# Altium PCB PCB_Flex_80.PcbDoc
Units mil, origin at the board's own origin, x right, y up, seen from the top; angles counter-clockwise.
Board outline 2362.2 x 1622.05 mil, 2 copper layers (Top Layer, Bottom Layer); 4 components, 80 nets, 320 pads, 159 vias.
Unrouted connection lines stored in the file: 1.
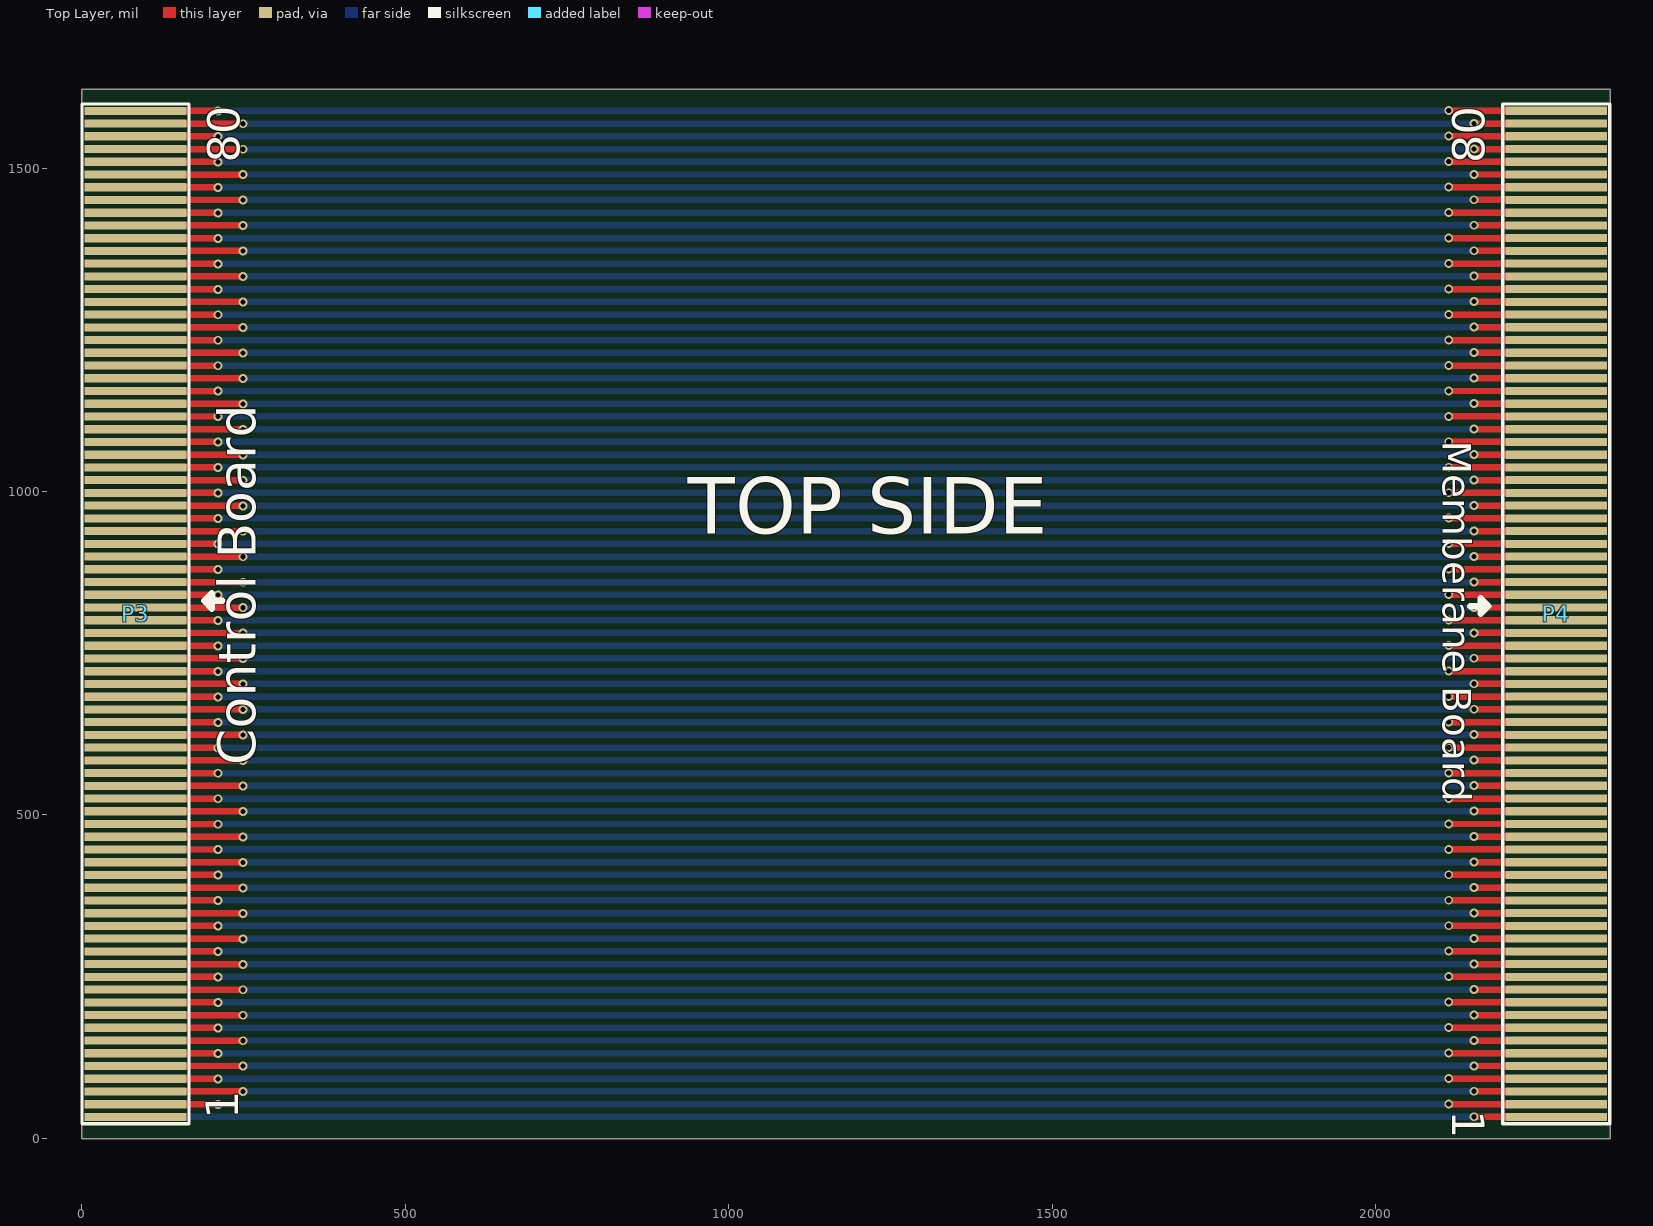
[diagram p0: Top Layer view]
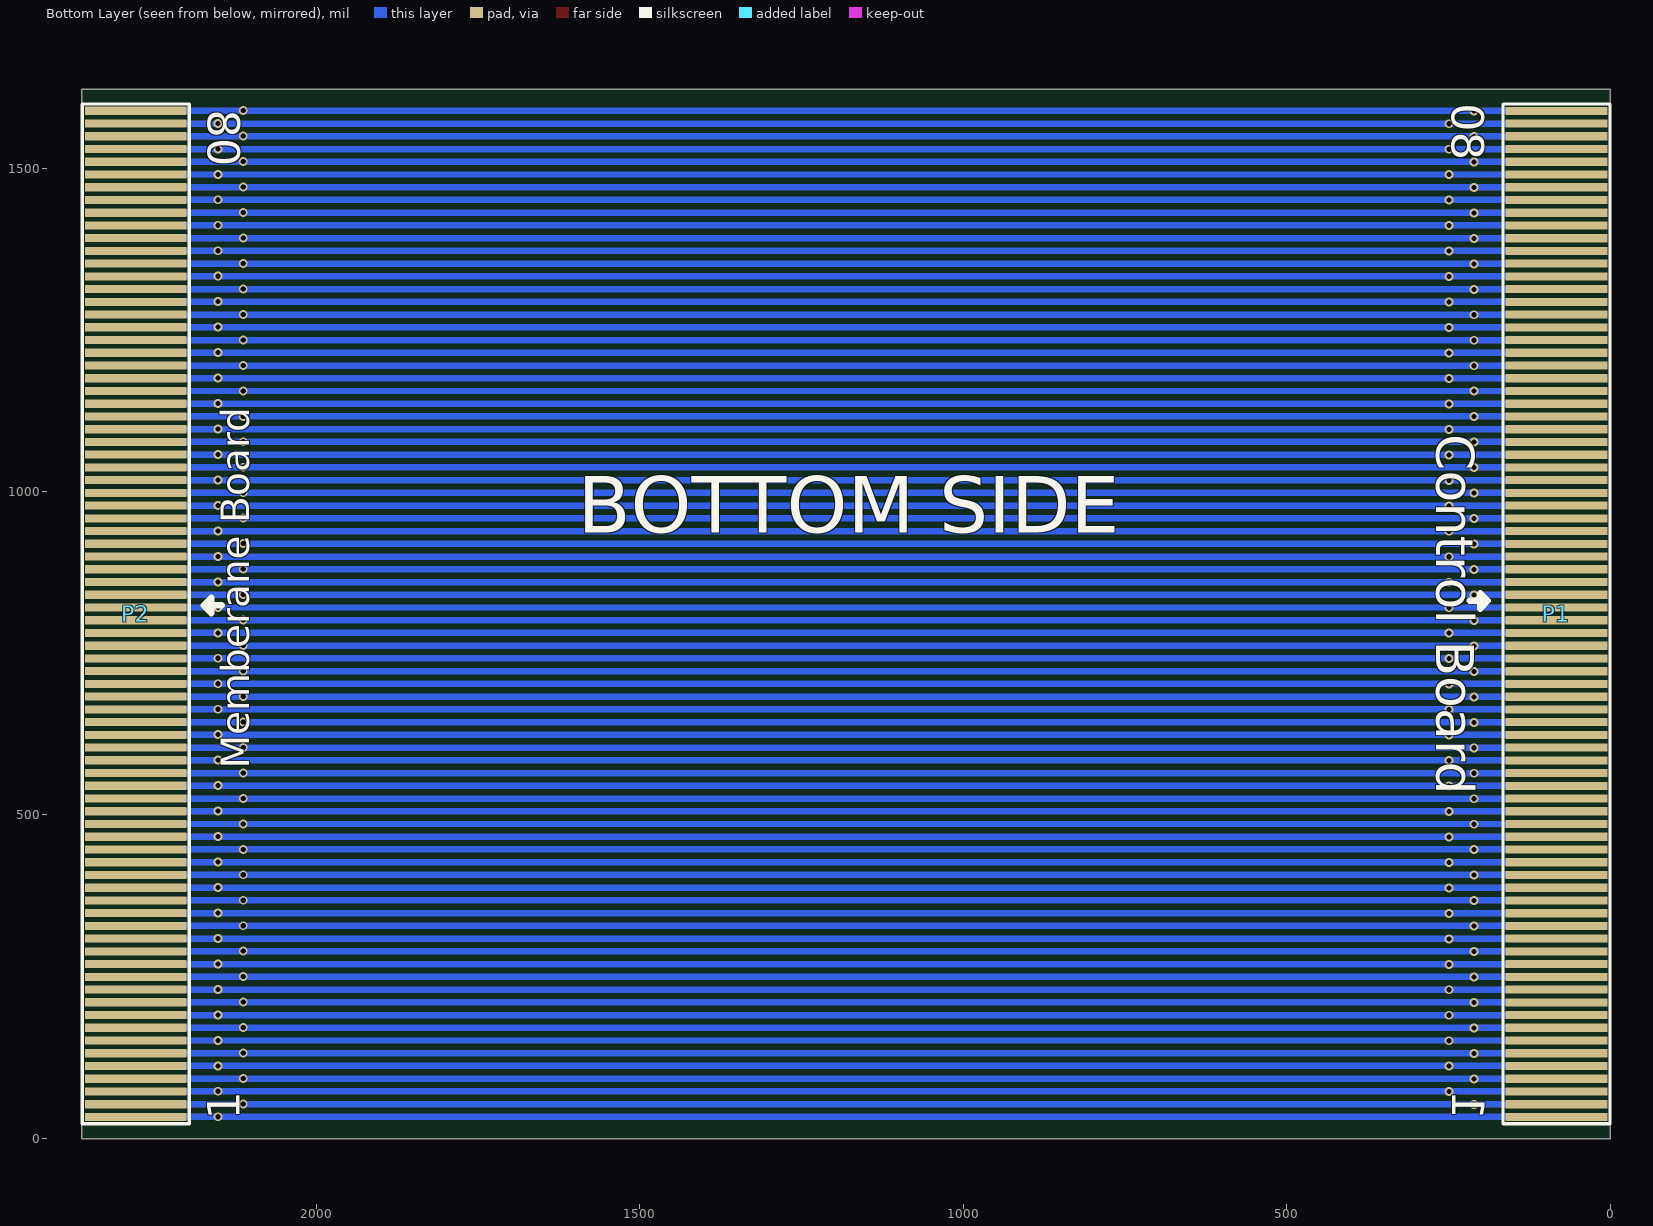
[diagram p1: Bottom Layer view, seen from below]

## Layer stack, top to bottom
Top Solder: solder mask 0.4, Solder Resist, Dk 3.5
Top Layer: signal copper 1.4
Dielectric 1: dielectric 12.6, FR-4, Dk 4.8
Bottom Layer: signal copper 1.4
Bottom Solder: solder mask 0.4, Solder Resist, Dk 3.5

## Board outline
0,-0.05 0,1622 2362.2,1622 2362.2,-0.05

## Design rules (kind name [scope] priority, off if disabled: settings)
Clearance [All] p1: gap=5 ignorepadtopadclearanceinfootprint=FALSE
ComponentClearance [All] p1: gap=0 collisioncheckmode=3 verticalgap=0 showdistances=FALSE
PolygonConnect [All] p1: connectstyle=Relief reliefconductorwidth=10 reliefentries=4 polygonreliefangle="90 Angle" airgapwidth=10
RoutingVias [All] p1: holewidth=11.81 width=23.62 viastyle="Through Hole" minholewidth=7.87 minwidth=13.78 maxholewidth=31.5 maxwidth=62.99
SolderMaskExpansion [All] p1: expansion=4 istentingtop=FALSE
Width [All] p1: maxlimit=10 minlimit=6 preferedwidth=8
29 further rules are at their usual default settings.

## Classes and differential pairs
component class Sheet1: P1 P2 P3

## Components (designator, comment, footprint, x,y, rotation, side; value= is the part's Value field where it differs from the comment)
P1 "80 Pin SMD PAD(4MM)" "80 PIN SMD PAD(4MM)" 83,810.83 r90 bottom
P2 "80 Pin SMD PAD(4MM)" "80 PIN SMD PAD(4MM)" 2279,810.88 r90 bottom locked
P3 "80 Pin SMD PAD(4MM)" "80 Pin SMD PAD(4mm)" 83,810.83 r90 top
P4 "80 Pin SMD PAD(4MM)" "80 Pin SMD PAD(4mm)" 2279,810.87 r90 top

## Footprints (in the part's own frame and the unit in brackets; to place one, negate y for a bottom-side part, rotate by r counter-clockwise, add the part's x,y. Pads: shape width x height; smd on the part's side, far side on the other; paste and mask are expansions set on the pad)
"80 PIN SMD PAD(4MM)" [mm]
  rect 0.32x4 smd: 1(-19.75,0) 2(-19.25,0) 3(-18.75,0) 4(-18.25,0) 5(-17.75,0) 6(-17.25,0) 7(-16.75,0) 8(-16.25,0) 9(-15.75,0) 10(-15.25,0) 11(-14.75,0) 12(-14.25,0) 13(-13.75,0) 14(-13.25,0) 15(-12.75,0) 16(-12.25,0) 17(-11.75,0) 18(-11.25,0) 19(-10.75,0) 20(-10.25,0) 21(-9.75,0) 22(-9.25,0) 23(-8.75,0) 24(-8.25,0) 25(-7.75,0) 26(-7.25,0) 27(-6.75,0) 28(-6.25,0) 29(-5.75,0) 30(-5.25,0) 31(-4.75,0) 32(-4.25,0) 33(-3.75,0) 34(-3.25,0) 35(-2.75,0) 36(-2.25,0) 37(-1.75,0) 38(-1.25,0) 39(-0.75,0) 40(-0.25,0) 41(0.25,0) 42(0.75,0) 43(1.25,0) 44(1.75,0) 45(2.25,0) 46(2.75,0) 47(3.25,0) 48(3.75,0) 49(4.25,0) 50(4.75,0) 51(5.25,0) 52(5.75,0) 53(6.25,0) 54(6.75,0) 55(7.25,0) 56(7.75,0) 57(8.25,0) 58(8.75,0) 59(9.25,0) 60(9.75,0) 61(10.25,0) 62(10.75,0) 63(11.25,0) 64(11.75,0) 65(12.25,0) 66(12.75,0) 67(13.25,0) 68(13.75,0) 69(14.25,0) 70(14.75,0) 71(15.25,0) 72(15.75,0) 73(16.25,0) 74(16.75,0) 75(17.25,0) 76(17.75,0) 77(18.25,0) 78(18.75,0) 79(19.25,0) 80(19.75,0)
  silkscreen extent -20.02,-2.1 20.02,2.1
"80 Pin SMD PAD(4mm)" [mm]
  rect 0.32x4 smd: 1(-19.75,0) 2(-19.25,0) 3(-18.75,0) 4(-18.25,0) 5(-17.75,0) 6(-17.25,0) 7(-16.75,0) 8(-16.25,0) 9(-15.75,0) 10(-15.25,0) 11(-14.75,0) 12(-14.25,0) 13(-13.75,0) 14(-13.25,0) 15(-12.75,0) 16(-12.25,0) 17(-11.75,0) 18(-11.25,0) 19(-10.75,0) 20(-10.25,0) 21(-9.75,0) 22(-9.25,0) 23(-8.75,0) 24(-8.25,0) 25(-7.75,0) 26(-7.25,0) 27(-6.75,0) 28(-6.25,0) 29(-5.75,0) 30(-5.25,0) 31(-4.75,0) 32(-4.25,0) 33(-3.75,0) 34(-3.25,0) 35(-2.75,0) 36(-2.25,0) 37(-1.75,0) 38(-1.25,0) 39(-0.75,0) 40(-0.25,0) 41(0.25,0) 42(0.75,0) 43(1.25,0) 44(1.75,0) 45(2.25,0) 46(2.75,0) 47(3.25,0) 48(3.75,0) 49(4.25,0) 50(4.75,0) 51(5.25,0) 52(5.75,0) 53(6.25,0) 54(6.75,0) 55(7.25,0) 56(7.75,0) 57(8.25,0) 58(8.75,0) 59(9.25,0) 60(9.75,0) 61(10.25,0) 62(10.75,0) 63(11.25,0) 64(11.75,0) 65(12.25,0) 66(12.75,0) 67(13.25,0) 68(13.75,0) 69(14.25,0) 70(14.75,0) 71(15.25,0) 72(15.75,0) 73(16.25,0) 74(16.75,0) 75(17.25,0) 76(17.75,0) 77(18.25,0) 78(18.75,0) 79(19.25,0) 80(19.75,0)
  silkscreen extent -20.02,-2.1 20.02,2.1

## Part data
P1 P2 P3 P4: "Ribbon Wire Connecting PADs, Length 2.6mm."

## Via types
v1: diameter 13.78, hole 7.87, Top Layer to Bottom Layer, tented both sides, 159 vias

## Nets (pads, with @x,y where several pads share a name; then routed paths per layer and width w, separated by ;. In a path a pad name is that pad's centre, name@x,y a point inside that pad or via, vN(x,y) a via of type N, cw(c..) or ccw(c..) an arc to the next point about the centre after c; other vN are vias at no path point)
SCL_1: P1.9 P2.9 P3.9 P4.9 | length 2490.1
  Top Layer w10: P3.9 v1@249.57,190.75 ; v1@2151.39,190.79 P4.9
  Bottom Layer w10: P1.9@83.08,190.83 P2.9
  other v1: 249.31,190.48 2151.65,191.06
SCL_2: P1.10 P2.10 P3.10 P4.10 | length 2490.1
  Top Layer w10: P3.10 v1@210.61,210.43 ; v1@2112.43,210.47 P4.10
  Bottom Layer w10: P1.10@83.08,210.52 P2.10
  other v1: 210.35,210.17 2112.69,210.74
SCL_3: P1.11 P2.11 P3.11 P4.11 | length 2490.1
  Top Layer w10: P3.11 v1@249.57,230.12 ; v1@2151.39,230.16 P4.11
  Bottom Layer w10: P1.11@83.08,230.2 P2.11
  other v1: 249.31,229.85 2151.65,230.43
SCL_4: P1.12 P2.12 P3.12 P4.12 | length 2490.1
  Top Layer w10: P3.12 v1@210.61,249.8 ; v1@2112.43,249.84 P4.12
  Bottom Layer w10: P1.12@83.08,249.89 P2.12
  other v1: 210.35,249.54 2112.69,250.11
SCL_5: P1.13 P2.13 P3.13 P4.13 | length 2490.1
  Top Layer w10: P3.13 v1@249.57,269.49 ; v1@2151.39,269.53 P4.13
  Bottom Layer w10: P1.13@83.08,269.57 P2.13@2279.03,269.57
  other v1: 249.31,269.22 2151.65,269.8
SCL_6: P1.14 P2.14 P3.14 P4.14 | length 2490.1
  Top Layer w10: P3.14 v1@210.61,289.17 ; v1@2112.43,289.21 P4.14
  Bottom Layer w10: P1.14@83.08,289.26 P2.14@2279.03,289.26
  other v1: 210.35,288.91 2112.69,289.48
SCL_7: P1.15 P2.15 P3.15 P4.15 | length 2490.1
  Top Layer w10: P3.15 v1@249.57,308.86 ; v1@2151.39,308.9 P4.15
  Bottom Layer w10: P1.15@83.08,308.94 P2.15
  other v1: 249.31,308.59 2151.65,309.17
SCL_8: P1.16 P2.16 P3.16 P4.16 | length 2490.1
  Top Layer w10: P3.16 v1@210.61,328.54 ; v1@2112.43,328.58 P4.16
  Bottom Layer w10: P1.16@83.08,328.63 P2.16
  other v1: 210.35,328.28 2112.69,328.85
SCL_9: P1.25 P2.25 P3.25 P4.25 | length 2490.1
  Top Layer w10: P3.25 v1@249.57,505.71 ; v1@2151.39,505.75 P4.25
  Bottom Layer w10: P1.25@83.06,505.76 P2.25
  other v1: 249.31,505.44 2151.65,506.02
SCL_10: P1.26 P2.26 P3.26 P4.26 | length 2490.1
  Top Layer w10: P3.26 v1@210.61,525.39 ; v1@2112.43,525.43 P4.26
  Bottom Layer w10: P1.26@83.06,525.45 P2.26
  other v1: 210.35,525.13 2112.69,525.7
SCL_11: P1.27 P2.27 P3.27 P4.27 | length 2490.1
  Top Layer w10: P3.27 v1@249.57,545.08 ; v1@2151.39,545.12 P4.27
  Bottom Layer w10: P1.27@83.08,545.16 P2.27@2279.03,545.16
  other v1: 249.31,544.81 2151.65,545.39
SCL_12: P1.28 P2.28 P3.28 P4.28 | length 2490.1
  Top Layer w10: P3.28 v1@210.61,564.76 ; v1@2112.43,564.8 P4.28
  Bottom Layer w10: P1.28@83.08,564.85 P2.28
  other v1: 210.35,564.5 2112.69,565.07
SCL_13: P1.29 P2.29 P3.29 P4.29 | length 2490.1
  Top Layer w10: P3.29 v1@249.57,584.45 ; v1@2151.39,584.49 P4.29
  Bottom Layer w10: P1.29@83.08,584.53 P2.29
  other v1: 249.31,584.18 2151.65,584.76
SCL_14: P1.30 P2.30 P3.30 P4.30 | length 2490.1
  Top Layer w10: P3.30 v1@210.61,604.13 ; v1@2112.43,604.17 P4.30
  Bottom Layer w10: P1.30@83.08,604.22 P2.30
  other v1: 210.35,603.87 2112.69,604.44
SCL_15: P1.31 P2.31 P3.31 P4.31 | length 2490.1
  Top Layer w10: P3.31 v1@249.57,623.82 ; v1@2151.39,623.86 P4.31
  Bottom Layer w10: P1.31@83.08,623.9 P2.31
  other v1: 249.31,623.55 2151.65,624.13
SCL_16: P1.32 P2.32 P3.32 P4.32 | length 2490.1
  Top Layer w10: P3.32 v1@210.61,643.5 ; v1@2112.43,643.54 P4.32
  Bottom Layer w10: P1.32@83.08,643.59 P2.32
  other v1: 210.35,643.24 2112.69,643.81
SCL_17: P1.41 P2.41 P3.41 P4.41 | length 2490.1
  Top Layer w10: P3.41 v1@249.57,820.67 ; v1@2151.39,820.71 P4.41
  Bottom Layer w10: P1.41@83.06,820.72 P2.41
  other v1: 249.31,820.4 2151.65,820.98
SCL_18: P1.42 P2.42 P3.42 P4.42 | length 2490.1
  Top Layer w10: P3.42 v1@210.61,840.35 ; v1@2112.43,840.39 P4.42
  Bottom Layer w10: P1.42@83.06,840.41 P2.42
  other v1: 210.35,840.09 2112.69,840.66
SCL_19: P1.43 P2.43 P3.43 P4.43 | length 2490.1
  Top Layer w10: P3.43 v1@249.57,860.04 ; v1@2151.39,860.08 P4.43
  Bottom Layer w10: P1.43@83.06,860.09 P2.43
  other v1: 249.31,859.77 2151.65,860.35
SCL_20: P1.44 P2.44 P3.44 P4.44 | length 2490.1
  Top Layer w10: P3.44 v1@210.61,879.72 ; v1@2112.43,879.76 P4.44
  Bottom Layer w10: P1.44@83.06,879.78 P2.44
  other v1: 210.35,879.46 2112.69,880.03
SCL_21: P1.45 P2.45 P3.45 P4.45 | length 2490.1
  Top Layer w10: P3.45 v1@249.57,899.41 ; v1@2151.39,899.45 P4.45
  Bottom Layer w10: P1.45@83.08,899.49 P2.45
  other v1: 249.31,899.14 2151.65,899.72
SCL_22: P1.46 P2.46 P3.46 P4.46 | length 2490.1
  Top Layer w10: P3.46 v1@210.61,919.09 ; v1@2112.43,919.13 P4.46
  Bottom Layer w10: P1.46@83.08,919.18 P2.46@2279.03,919.18
  other v1: 210.35,918.83 2112.69,919.4
SCL_23: P1.47 P2.47 P3.47 P4.47 | length 2490.1
  Top Layer w10: P3.47 v1@249.57,938.78 ; v1@2151.39,938.82 P4.47
  Bottom Layer w10: P1.47@83.08,938.86 P2.47@2279.03,938.86
  other v1: 249.31,938.51 2151.65,939.09
SCL_24: P1.48 P2.48 P3.48 P4.48 | length 2490.1
  Top Layer w10: P3.48 v1@210.61,958.46 ; v1@2112.43,958.5 P4.48
  Bottom Layer w10: P1.48@83.08,958.55 P2.48
  other v1: 210.35,958.2 2112.69,958.77
SCL_25: P1.57 P2.57 P3.57 P4.57 | length 2490.1
  Top Layer w10: P3.57 v1@249.57,1135.63 ; v1@2151.39,1135.67 P4.57
  Bottom Layer w10: P1.57@83.06,1135.68 P2.57
  other v1: 249.31,1135.36 2151.65,1135.94
SCL_26: P1.58 P2.58 P3.58 P4.58 | length 2490.1
  Top Layer w10: P3.58 v1@210.61,1155.32 ; v1@2112.43,1155.35 P4.58
  Bottom Layer w10: P1.58@83.06,1155.37 P2.58
  other v1: 210.35,1155.05 2112.69,1155.62
SCL_27: P1.59 P2.59 P3.59 P4.59 | length 2490.1
  Top Layer w10: P3.59 v1@249.57,1175 ; v1@2151.39,1175.04 P4.59
  Bottom Layer w10: P1.59@83.06,1175.05 P2.59
  other v1: 249.31,1174.73 2151.65,1175.31
SCL_28: P1.60 P2.60 P3.60 P4.60 | length 2490.1
  Top Layer w10: P3.60 v1@210.61,1194.69 ; v1@2112.43,1194.72 P4.60
  Bottom Layer w10: P1.60@83.06,1194.74 P2.60
  other v1: 210.35,1194.42 2112.69,1194.99
SCL_29: P1.61 P2.61 P3.61 P4.61 | length 2490.1
  Top Layer w10: P3.61 v1@249.57,1214.37 ; v1@2151.39,1214.41 P4.61
  Bottom Layer w10: P1.61@83.06,1214.43 P2.61
  other v1: 249.31,1214.1 2151.65,1214.68
SCL_30: P1.62 P2.62 P3.62 P4.62 | length 2490.1
  Top Layer w10: P3.62 v1@210.61,1234.06 ; v1@2112.43,1234.09 P4.62
  Bottom Layer w10: P1.62@83.06,1234.11 P2.62
  other v1: 210.35,1233.79 2112.69,1234.36
SCL_31: P1.63 P2.63 P3.63 P4.63 | length 2490.1
  Top Layer w10: P3.63 v1@249.57,1253.74 ; v1@2151.39,1253.78 P4.63
  Bottom Layer w10: P1.63@83.06,1253.8 P2.63
  other v1: 249.31,1253.47 2151.65,1254.05
SCL_32: P1.64 P2.64 P3.64 P4.64 | length 2490.1
  Top Layer w10: P3.64 v1@210.61,1273.43 ; v1@2112.43,1273.46 P4.64
  Bottom Layer w10: P1.64@83.06,1273.48 P2.64
  other v1: 210.35,1273.16 2112.69,1273.73
SCL_33: P1.73 P2.73 P3.73 P4.73 | length 2490.1
  Top Layer w10: P3.73 v1@249.57,1450.59 ; v1@2151.39,1450.63 P4.73
  Bottom Layer w10: P1.73 P2.73
  other v1: 249.31,1450.32 2151.65,1450.9
SCL_34: P1.74 P2.74 P3.74 P4.74 | length 2490.1
  Top Layer w10: P3.74 v1@210.61,1470.28 ; v1@2112.43,1470.32 P4.74
  Bottom Layer w10: P1.74 P2.74
  other v1: 210.35,1470.01 2112.69,1470.58
SCL_35: P1.75 P2.75 P3.75 P4.75 | length 2490.1
  Top Layer w10: P3.75 v1@249.57,1489.96 ; v1@2151.39,1490 P4.75
  Bottom Layer w10: P1.75 P2.75
  other v1: 249.31,1489.69 2151.65,1490.27
SCL_36: P1.76 P2.76 P3.76 P4.76 | length 2490.1
  Top Layer w10: P3.76 v1@210.61,1509.65 ; v1@2112.43,1509.69 P4.76
  Bottom Layer w10: P1.76@83.03,1509.67 P2.76
  other v1: 210.35,1509.38 2112.69,1509.95
SCL_37: P1.77 P2.77 P3.77 P4.77 | length 2490.1
  Top Layer w10: P3.77 v1@249.57,1529.33 ; v1@2151.39,1529.37 P4.77
  Bottom Layer w10: P1.77@83.03,1529.36 P2.77
  other v1: 249.31,1529.06 2151.65,1529.64
SCL_38: P1.78 P2.78 P3.78 P4.78 | length 2490.1
  Top Layer w10: P3.78 v1@210.61,1549.02 ; v1@2112.43,1549.06 P4.78
  Bottom Layer w10: P1.78 P2.78@2278.97,1549.04
  other v1: 210.35,1548.75 2112.69,1549.32
SCL_39: P1.79 P2.79 P3.79 P4.79 | length 2490.1
  Top Layer w10: P3.79 v1@249.57,1568.7 ; v1@2151.39,1568.74 P4.79
  Bottom Layer w10: P1.79 P2.79@2278.97,1568.73
  other v1: 249.31,1568.43 2151.65,1569.01
SCL_40: P1.80 P2.80 P3.80 P4.80 | length 2490.1
  Top Layer w10: P3.80 v1@210.61,1588.39 ; v1@2112.43,1588.43 P4.80
  Bottom Layer w10: P1.80 P2.80
  other v1: 210.35,1588.12 2112.69,1588.69
SDA_1: P1.1 P2.1 P3.1 P4.1 | length 2323.6
  Top Layer w10: v1@2151.39,33.31 P4.1
  Bottom Layer w10: P1.1@83.06,33.32 P2.1
  other v1: 2151.65,33.57
SDA_2: P1.2 P2.2 P3.2 P4.2 | length 2490.1
  Top Layer w10: P3.2 v1@210.61,52.95 ; v1@2112.43,52.99 P4.2
  Bottom Layer w10: P1.2@83.06,53.01 P2.2
  other v1: 210.35,52.69 2112.69,53.26
SDA_3: P1.3 P2.3 P3.3 P4.3 | length 2490.1
  Top Layer w10: P3.3 v1@249.57,72.64 ; v1@2151.39,72.68 P4.3
  Bottom Layer w10: P1.3@83.06,72.69 P2.3
  other v1: 249.31,72.37 2151.65,72.94
SDA_4: P1.4 P2.4 P3.4 P4.4 | length 2490.1
  Top Layer w10: P3.4 v1@210.61,92.32 ; v1@2112.43,92.36 P4.4
  Bottom Layer w10: P1.4@83.06,92.38 P2.4
  other v1: 210.35,92.06 2112.69,92.63
SDA_5: P1.5 P2.5 P3.5 P4.5 | length 2490.1
  Top Layer w10: P3.5 v1@249.57,112.01 ; v1@2151.39,112.05 P4.5
  Bottom Layer w10: P1.5@83.06,112.06 P2.5
  other v1: 249.31,111.74 2151.65,112.32
SDA_6: P1.6 P2.6 P3.6 P4.6 | length 2490.1
  Top Layer w10: P3.6 v1@210.61,131.69 ; v1@2112.43,131.73 P4.6
  Bottom Layer w10: P1.6@83.06,131.75 P2.6
  other v1: 210.35,131.43 2112.69,132
SDA_7: P1.7 P2.7 P3.7 P4.7 | length 2490.1
  Top Layer w10: P3.7 v1@249.57,151.38 ; v1@2151.39,151.42 P4.7
  Bottom Layer w10: P1.7@83.06,151.43 P2.7
  other v1: 249.31,151.11 2151.65,151.68
SDA_8: P1.8 P2.8 P3.8 P4.8 | length 2490.1
  Top Layer w10: P3.8 v1@210.61,171.06 ; v1@2112.43,171.1 P4.8
  Bottom Layer w10: P1.8@83.06,171.12 P2.8
  other v1: 210.35,170.8 2112.69,171.37
SDA_9: P1.17 P2.17 P3.17 P4.17 | length 2490.1
  Top Layer w10: P3.17 v1@249.57,348.23 ; v1@2151.39,348.27 P4.17
  Bottom Layer w10: P1.17@83.08,348.31 P2.17
  other v1: 249.31,347.96 2151.65,348.54
SDA_10: P1.18 P2.18 P3.18 P4.18 | length 2490.1
  Top Layer w10: P3.18 v1@210.61,367.91 ; v1@2112.43,367.95 P4.18
  Bottom Layer w10: P1.18@83.06,367.97 P2.18
  other v1: 210.35,367.65 2112.69,368.22
SDA_11: P1.19 P2.19 P3.19 P4.19 | length 2490.1
  Top Layer w10: P3.19 v1@249.57,387.6 ; v1@2151.39,387.64 P4.19
  Bottom Layer w10: P1.19@83.06,387.65 P2.19
  other v1: 249.31,387.33 2151.65,387.91
SDA_12: P1.20 P2.20 P3.20 P4.20 | length 2490.1
  Top Layer w10: P3.20 v1@210.61,407.28 ; v1@2112.43,407.32 P4.20
  Bottom Layer w10: P1.20@83.06,407.34 P2.20
  other v1: 210.35,407.02 2112.69,407.59
SDA_13: P1.21 P2.21 P3.21 P4.21 | length 2490.1
  Top Layer w10: P3.21 v1@249.57,426.97 ; v1@2151.39,427.01 P4.21
  Bottom Layer w10: P1.21@83.06,427.02 P2.21
  other v1: 249.31,426.7 2151.65,427.28
SDA_14: P1.22 P2.22 P3.22 P4.22 | length 2490.1
  Top Layer w10: P3.22 v1@210.61,446.65 ; v1@2112.43,446.69 P4.22
  Bottom Layer w10: P1.22@83.06,446.71 P2.22
  other v1: 210.35,446.39 2112.69,446.96
SDA_15: P1.23 P2.23 P3.23 P4.23 | length 2490.1
  Top Layer w10: P3.23 v1@249.57,466.34 ; v1@2151.39,466.38 P4.23
  Bottom Layer w10: P1.23@83.06,466.39 P2.23
  other v1: 249.31,466.07 2151.65,466.65
SDA_16: P1.24 P2.24 P3.24 P4.24 | length 2490.1
  Top Layer w10: P3.24 v1@210.61,486.02 ; v1@2112.43,486.06 P4.24
  Bottom Layer w10: P1.24@83.06,486.08 P2.24
  other v1: 210.35,485.76 2112.69,486.33
SDA_17: P1.33 P2.33 P3.33 P4.33 | length 2490.1
  Top Layer w10: P3.33 v1@249.57,663.19 ; v1@2151.39,663.23 P4.33
  Bottom Layer w10: P1.33@83.08,663.27 P2.33@2279.03,663.27
  other v1: 249.31,662.92 2151.65,663.5
SDA_18: P1.34 P2.34 P3.34 P4.34 | length 2490.1
  Top Layer w10: P3.34 v1@210.61,682.87 ; v1@2112.43,682.91 P4.34
  Bottom Layer w10: P1.34@83.08,682.96 P2.34@2279.03,682.96
  other v1: 210.35,682.61 2112.69,683.18
SDA_19: P1.35 P2.35 P3.35 P4.35 | length 2490.1
  Top Layer w10: P3.35 v1@249.57,702.56 ; v1@2151.39,702.6 P4.35
  Bottom Layer w10: P1.35@83.08,702.64 P2.35
  other v1: 249.31,702.29 2151.65,702.87
SDA_20: P1.36 P2.36 P3.36 P4.36 | length 2490.1
  Top Layer w10: P3.36 v1@210.61,722.24 ; v1@2112.43,722.28 P4.36
  Bottom Layer w10: P1.36@83.06,722.3 P2.36
  other v1: 210.35,721.98 2112.69,722.55
SDA_21: P1.37 P2.37 P3.37 P4.37 | length 2490.1
  Top Layer w10: P3.37 v1@249.57,741.93 ; v1@2151.39,741.97 P4.37
  Bottom Layer w10: P1.37@83.06,741.98 P2.37
  other v1: 249.31,741.66 2151.65,742.24
SDA_22: P1.38 P2.38 P3.38 P4.38 | length 2490.1
  Top Layer w10: P3.38 v1@210.61,761.61 ; v1@2112.43,761.65 P4.38
  Bottom Layer w10: P1.38@83.06,761.67 P2.38
  other v1: 210.35,761.35 2112.69,761.92
SDA_23: P1.39 P2.39 P3.39 P4.39 | length 2490.1
  Top Layer w10: P3.39 v1@249.57,781.3 ; v1@2151.39,781.34 P4.39
  Bottom Layer w10: P1.39@83.06,781.35 P2.39
  other v1: 249.31,781.03 2151.65,781.61
SDA_24: P1.40 P2.40 P3.40 P4.40 | length 2490.1
  Top Layer w10: P3.40 v1@210.61,800.98 ; v1@2112.43,801.02 P4.40
  Bottom Layer w10: P1.40@83.06,801.04 P2.40
  other v1: 210.35,800.72 2112.69,801.29
SDA_25: P1.49 P2.49 P3.49 P4.49 | length 2490.1
  Top Layer w10: P3.49 v1@249.57,978.15 ; v1@2151.39,978.19 P4.49
  Bottom Layer w10: P1.49@83.08,978.23 P2.49
  other v1: 249.31,977.88 2151.65,978.46
SDA_26: P1.50 P2.50 P3.50 P4.50 | length 2490.1
  Top Layer w10: P3.50 v1@210.61,997.83 ; v1@2112.43,997.87 P4.50
  Bottom Layer w10: P1.50@83.08,997.92 P2.50
  other v1: 210.35,997.57 2112.69,998.14
SDA_27: P1.51 P2.51 P3.51 P4.51 | length 2490.1
  Top Layer w10: P3.51 v1@249.57,1017.52 ; v1@2151.39,1017.56 P4.51
  Bottom Layer w10: P1.51@83.08,1017.6 P2.51
  other v1: 249.31,1017.25 2151.65,1017.83
SDA_28: P1.52 P2.52 P3.52 P4.52 | length 2490.1
  Top Layer w10: P3.52 v1@210.61,1037.2 ; v1@2112.43,1037.24 P4.52
  Bottom Layer w10: P1.52@83.08,1037.29 P2.52
  other v1: 210.35,1036.94 2112.69,1037.51
SDA_29: P1.53 P2.53 P3.53 P4.53 | length 2490.1
  Top Layer w10: P3.53 v1@249.57,1056.89 ; v1@2151.39,1056.93 P4.53
  Bottom Layer w10: P1.53@83.08,1056.97 P2.53@2279.03,1056.97
  other v1: 249.31,1056.62 2151.65,1057.2
SDA_30: P1.54 P2.54 P3.54 P4.54 | length 2490.1
  Top Layer w10: P3.54 v1@210.61,1076.57 ; v1@2112.43,1076.61 P4.54
  Bottom Layer w10: P1.54@83.06,1076.63 P2.54
  other v1: 210.35,1076.31 2112.69,1076.88
SDA_31: P1.55 P2.55 P3.55 P4.55 | length 2490.1
  Top Layer w10: P3.55 v1@249.57,1096.26 ; v1@2151.39,1096.3 P4.55
  Bottom Layer w10: P1.55@83.06,1096.32 P2.55
  other v1: 249.31,1095.99 2151.65,1096.57
SDA_32: P1.56 P2.56 P3.56 P4.56 | length 2490.1
  Top Layer w10: P3.56 v1@210.61,1115.95 ; v1@2112.43,1115.98 P4.56
  Bottom Layer w10: P1.56@83.06,1116 P2.56
  other v1: 210.35,1115.68 2112.69,1116.25
SDA_33: P1.65 P2.65 P3.65 P4.65 | length 2490.1
  Top Layer w10: P3.65 v1@249.57,1293.11 ; v1@2151.39,1293.15 P4.65
  Bottom Layer w10: P1.65@83.06,1293.17 P2.65
  other v1: 249.31,1292.84 2151.65,1293.42
SDA_34: P1.66 P2.66 P3.66 P4.66 | length 2490.1
  Top Layer w10: P3.66 v1@210.61,1312.8 ; v1@2112.43,1312.83 P4.66
  Bottom Layer w10: P1.66@83.06,1312.85 P2.66
  other v1: 210.35,1312.53 2112.69,1313.1
SDA_35: P1.67 P2.67 P3.67 P4.67 | length 2490.1
  Top Layer w10: P3.67 v1@249.57,1332.48 ; v1@2151.39,1332.52 P4.67
  Bottom Layer w10: P1.67@83.06,1332.54 P2.67
  other v1: 249.31,1332.21 2151.65,1332.79
SDA_36: P1.68 P2.68 P3.68 P4.68 | length 2490.1
  Top Layer w10: P3.68 v1@210.61,1352.17 ; v1@2112.43,1352.2 P4.68
  Bottom Layer w10: P1.68@83.06,1352.22 P2.68
  other v1: 210.35,1351.9 2112.69,1352.47
SDA_37: P1.69 P2.69 P3.69 P4.69 | length 2490.1
  Top Layer w10: P3.69 v1@249.57,1371.85 ; v1@2151.39,1371.89 P4.69
  Bottom Layer w10: P1.69@83.06,1371.91 P2.69
  other v1: 249.31,1371.58 2151.65,1372.16
SDA_38: P1.70 P2.70 P3.70 P4.70 | length 2490.1
  Top Layer w10: P3.70 v1@210.61,1391.54 ; v1@2112.43,1391.57 P4.70
  Bottom Layer w10: P1.70@83.06,1391.59 P2.70
  other v1: 210.35,1391.27 2112.69,1391.84
SDA_39: P1.71 P2.71 P3.71 P4.71 | length 2490.1
  Top Layer w10: P3.71 v1@249.57,1411.22 ; v1@2151.39,1411.26 P4.71
  Bottom Layer w10: P1.71@83.06,1411.28 P2.71
  other v1: 249.31,1410.95 2151.65,1411.53
SDA_40: P1.72 P2.72 P3.72 P4.72 | length 2490.1
  Top Layer w10: P3.72 v1@210.61,1430.91 ; v1@2112.43,1430.94 P4.72
  Bottom Layer w10: P1.72 P2.72@2278.97,1430.93
  other v1: 210.35,1430.64 2112.69,1431.21

## Silkscreen, mask and mechanical layers (free items; w line width, h text height)
Top Overlay:
  lines w10: 201,830.95 217,830.95 ; 2146.01,822.96 2162.01,822.96 ; 189,830.95 201,818.95 201,842.95 189,830.95 ; 2162.01,810.96 2174.01,822.96 2162.01,834.96 2162.01,810.96
  text "80" at 244.04,1507.89 h50 r90
  text "80" at 2168.75,1507.21 h50 r90
  text "Memberane Board" at 2088.66,1078.71 h75 r270
  text "TOP SIDE" at 936.64,906.32 h150
  text "Control Board" at 288.12,576.54 h100 r90
  text "1" at 2118,44 h50 r270
  text "1" at 242,30 h50 r90
Bottom Overlay:
  lines w10: 201,830.95 217,830.95 ; 2146.01,823.96 2162.01,823.96 ; 189,830.95 201,842.95 201,818.95 189,830.95 ; 2162.01,811.96 2162.01,835.96 2174.01,823.96 2162.01,811.96
  text "80" at 2168,1590 h50 r90
  text "80" at 245,1512 h50 r90
  text "Control Board" at 288.12,1088.36 h100 r90
  text "BOTTOM SIDE" at 1595.67,907.32 h150
  text "Memberane Board" at 2088.66,571.19 h75 r270
  text "1" at 244,29 h50 r90
  text "1" at 2118,29.06 h50 r270
Mechanical 2:
  the board outline again, w5

## Dimensions
0,1622 to 0,-0.05 on Mechanical 1
2362.2,1622 to 0,1622 on Mechanical 1